# Altium PCB PCB1.PcbDoc
Units mm, origin at the board's own origin, x right, y up, seen from the top; angles counter-clockwise.
Board outline 35.5 x 30 mm, 2 copper layers (Top Layer, Bottom Layer); 43 components, 30 nets, 125 pads, 8 vias.
Unrouted connection lines stored in the file: 56.
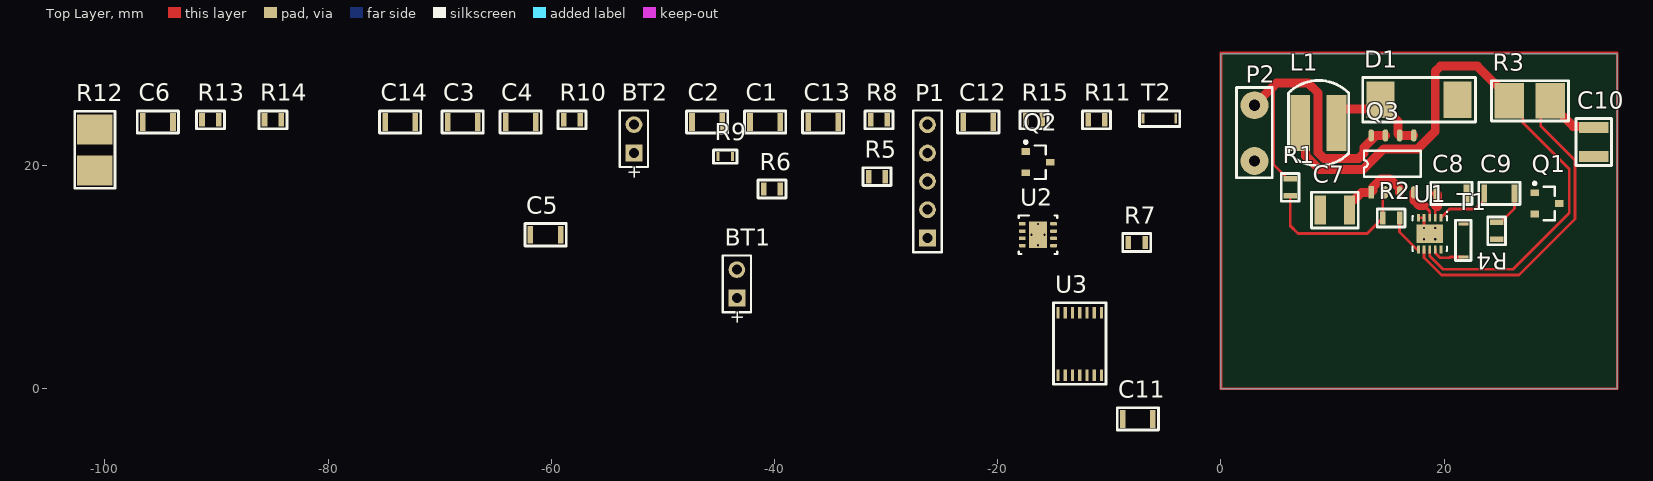
[diagram p0: Top Layer view]
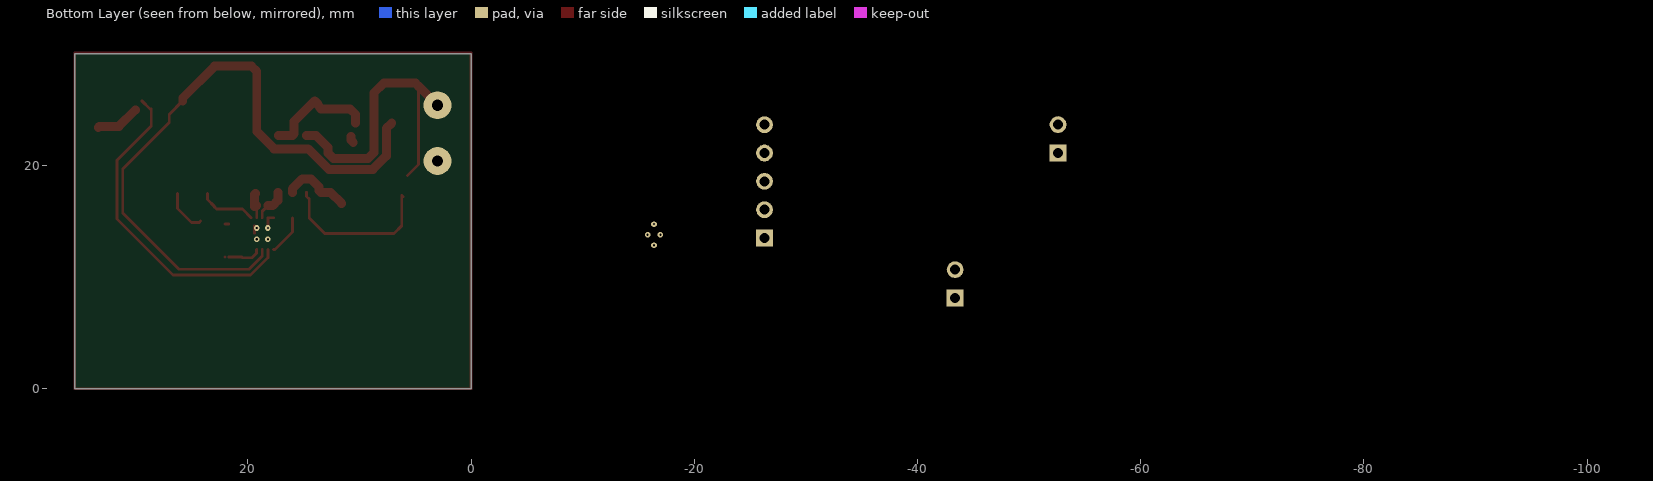
[diagram p1: Bottom Layer view, seen from below]

## Layer stack, top to bottom
Top Solder: solder mask 0.0102, Solder Resist, Dk 3.5
Top Layer: signal copper 0.0356
Dielectric 1: dielectric 0.32, FR-4, Dk 4.8
Bottom Layer: signal copper 0.0356
Bottom Solder: solder mask 0.0102, Solder Resist, Dk 3.5

## Board outline
0,0 35.5,0 35.5,30 0,30

## Design rules (kind name [scope] priority, off if disabled: settings)
Clearance [All] p1: gap=0.254 ignorepadtopadclearanceinfootprint=TRUE except(0: Arc-Hole Track-Hole SMDPad-Hole THPad-Hole Via-Hole Fill-Hole Poly-Hole Region-Hole Text-Hole; 0.2: Arc-Arc Arc-Track Track-Track)
PolygonConnect [All] p1: connectstyle=Relief reliefconductorwidth=0.254 reliefentries=4 polygonreliefangle="90 Angle" airgapwidth=0.254
RoutingVias [All] p1: holewidth=0.711 width=1.27 viastyle="Through Hole" minholewidth=0.711 minwidth=1.27 maxholewidth=0.711 maxwidth=1.27
SolderMaskExpansion [All] p1: expansion=0.102
Width [All] p1: maxlimit=0.8 minlimit=0.2 preferedwidth=0.254 minimp=50.000000 maximp=50.000000 favimp=50.000000
30 further rules are at their usual default settings.

## Components (designator, comment, footprint, x,y, rotation, side; value= is the part's Value field where it differs from the comment)
BT1 "Battery" BAT-2 -43.373,9.4 r90 top
BT2 "Battery" BAT-2 -52.6,22.4 r90 top
C1 "Cap1206" CAP1206 -42.2,23.9 r0 top
C2 "Cap1206" CAP1206 -47.4,23.9 r0 top
C3 "Cap1206" CAP1206 -69.3,23.9 r0 top
C4 "Cap1206" CAP1206 -64.1,23.9 r0 top
C5 "Cap1206" CAP1206 -61.873,13.8 r0 top
C6 "Cap1206" CAP1206 -96.6,23.9 r0 top
C7 "Cap1210" Ñap1210 10.2,16 r180 top
C8 "Cap1206" CAP1206 19.3,17.5 r0 top
C9 "Cap1206" CAP1206 23.6,17.5 r0 top
C10 "Cap1210" Ñap1210 33.4,22.1 r270 top
C11 "Cap1206" CAP1206 -6.1,-2.7 r180 top
C12 "Cap1206" CAP1206 -23.1,23.9 r0 top
C13 "Cap1206" CAP1206 -37,23.9 r0 top
C14 "Cap1206" CAP1206 -74.9,23.9 r0 top
D1 "B330-13-F" B330-13-F 21.2,25.9 r180 top
L1 "SDR0503-270ML" SDR0503 8.725,23.8 r180 top
P1 "Header 5" HDR1X5 -26.3,13.5 r90 top
P2 "THT Pad 5mm" "THT Pad 5mm" 3,20.4 r90 top
Q1 "BSS205N" INF-PG-SOT23_L 29.2,16.6 r0 top
Q2 "BSS205N" INF-PG-SOT23_L -16.4,20.3 r0 top
Q3 "SI9933BDY" "JEDEC MS-012.AA" 13.46,17.6 r90 top
R1 "Res0805" RES0805 6.2,18.8 r270 top
R2 "Res0805" RES0805 14.5,15.3 r0 top
R3 "Res2512" Res2512 27.665,25.8 r0 top
R4 "Res0805" RES0805 24.7,14.9 r270 top
R5 "Res0805" RES0805 -31.573,19 r0 top
R6 "Res0805" RES0805 -40.973,17.9 r0 top
R7 "Res0805" RES0805 -8.3,13.1 r0 top
R8 "Res0805" RES0805 -31.4,24.1 r0 top
R9 "Res0603" RES0603 -45.073,20.8 r0 top
R10 "Res0805" RES0805 -58.9,24.1 r0 top
R11 "Res0805" RES0805 -11.9,24.1 r0 top
R12 "Res2512" Res2512 -100.9,21.4 r90 top
R13 "Res0805" RES0805 -91.3,24.1 r0 top
R14 "Res0805" RES0805 -85.7,24.1 r0 top
R15 "Res0805" RES0805 -17.5,24.1 r0 top
T1 "B57621C5103J062" Therm1206 21.711,11.8 r90 top
T2 "B57621C5103J062" Therm1206 -7,24.2 r0 top
U1 "LTC4002EDD-8.4#TRPBF" LT-DD-10_V 18.7,13.9 r270 top
U2 "BQ29209DRBT" DRB0008B_V -16.4,13.8 r0 top
U3 "bq34z100-G1" bq34z100-G1 -14.6,1.2 r0 top

## Footprints (in the part's own frame and the unit in brackets; to place one, negate y for a bottom-side part, rotate by r counter-clockwise, add the part's x,y. Pads: shape width x height; smd on the part's side, far side on the other; paste and mask are expansions set on the pad)
B330-13-F [mm]
  rect 2.5x3.3 smd: 1(0,0) 2(6.9,0)
  silkscreen extent -1.6,-2 8.5,2
BAT-2 [mm] "Battery; 2 Leads"
  rect 1.5x1.5 hole 0.9: 1(-1.27,0)
  round 1.5 hole 0.9: 2(1.27,0)
  silkscreen extent -2.54,-1.27 2.54,1.27
bq34z100-G1 [mm]
  rect 0.3x1.05 smd: 1(0,0) 2(0.65,0) 3(1.3,0) 4(1.95,0) 5(2.6,0) 6(3.25,0) 7(3.9,0) 8(3.9,5.6) 9(3.25,5.6) 10(2.6,5.6) 11(1.95,5.6) 12(1.3,5.6) 13(0.65,5.6) 14(0,5.6)
  silkscreen extent -0.4,-0.8 4.3,6.5
CAP1206 [mm]
  rect 0.5x1.6 smd: 1(0,0) 2(2.7,0)
  silkscreen extent -0.5,-1 3.2,1
DRB0008B_V [mm] "SON, 8-Leads, Body 3x3mm, Pitch 0.65mm, Thermal Pad 2.4x1.65mm, TI Recommended"
  rrect33% 0.6x0.3 smd: 1(-1.4,0.975) 2(-1.4,0.325) 3(-1.4,-0.325) 4(-1.4,-0.975) 5(1.4,-0.975) 6(1.4,-0.325) 7(1.4,0.325) 8(1.4,0.975)
  rrect6% 1.65x2.4 smd paste-1.2: 9(0,0)
  silkscreen extent -1.73,-1.73 1.73,1.73, body extent -1.5,-1.5 1.5,1.5, height 0.96
HDR1X5 [mm] "Connector; Header; 5 Position"
  rect 1.5x1.5 hole 0.9: 1(0,0)
  round 1.5 hole 0.9: 2(2.54,0) 3(5.08,0) 4(7.62,0) 5(10.16,0)
  silkscreen extent -1.27,-1.27 11.43,1.27
INF-PG-SOT23_L [mm] "SOT23, 3-Leads, Body 2.9x1.3mm, Pitch 0.95mm, IPC High Density"
  rect 0.75x0.6 smd: 1(-1.1,0.95) 2(-1.1,-0.95) 3(1.1,0)
  silkscreen extent -1.22,-1.5 0.7,1.92, body extent -0.7,-1.5 0.7,1.5, height 1.1
"JEDEC MS-012.AA" [mm]
  rect 1.1x0.5 smd: 1(0,0)
  oval 1.1x0.5 smd: 2(0,-1.27) 3(0,-2.54) 4(0,-3.81) 5(5.1,-3.81) 6(5.1,-2.54) 7(5.1,-1.27) 8(5.1,0)
  silkscreen extent 1.38,-4.44 3.72,0.64
LT-DD-10_V [mm] "SON, 10-Leads, Body 3x3mm, Pitch 0.5mm, Thermal Pad 2.38x1.65mm"
  rect 0.7x0.25 smd mask+0.102: 1(-1.425,1) 2(-1.425,0.5) 3(-1.425,0) 4(-1.425,-0.5) 5(-1.425,-1) 6(1.425,-1) 7(1.425,-0.5) 8(1.425,0) 9(1.425,0.5) 10(1.425,1)
  rect 1.65x2.38 smd mask+0.102: 11(0,0)
  silkscreen extent -2,-1.55 1.55,1.6, body extent -1.5,-1.5 1.5,1.5, height 0.8
RES0603 [mm]
  rect 0.3x0.8 smd: 1(0,0) 2(1.3,0)
  silkscreen extent -0.4,-0.6 1.7,0.6
RES0805 [mm]
  rect 0.5x1.2 smd: 1(0,0) 2(1.5,0)
  silkscreen extent -0.5,-0.8 2,0.8
Res2512 [mm]
  rect 2.68x3.18 smd: 1(-1.835,0) 2(1.835,0)
  silkscreen extent -3.43,-1.8 3.46,1.8
SDR0503 [mm]
  rect 1.75x5 smd: 1(-1.625,0) 2(1.625,0)
  silkscreen extent -2.73,-3.82 2.67,3.82
Therm1206 [mm]
  rect 0.25x0.9 smd: 1(0,0) 2(2.95,0)
  silkscreen extent -0.3,-0.7 3.3,0.7
"THT Pad 5mm" [mm]
  round 2.5 hole 1: 1(0,0) 2(5,0)
  silkscreen extent -1.5,-1.6 6.6,1.6
Ñap1210 [mm]
  rect 1x2.6 smd: 1(-1.3,0) 2(1.3,0)
  silkscreen extent -2.1,-1.6 2.1,1.6

## Part data
BT1 BT2: "Multicell Battery", LatestRevisionDate=17-Jul-2002, LatestRevisionNote="Re-released for DXP Platform.", PackageDescription="Battery; 2 Leads", PackageReference=BAT-2, Published=24-Mar-1999, Publisher="Altium Limited"
P1: "Header, 5-Pin", LatestRevisionDate=17-Jul-2002, LatestRevisionNote="Re-released for DXP Platform.", Publisher="Altium Limited"
Q1 Q2: library part CMP-1149-00030-1, "N-Channel OptiMOS 2 Small-Signal-Transistor, 20 V VDS, 2.5 A ID, -55 to 150 degC, PG-SOT23, Reel, Green", Manufacturer=Infineon, ComponentLink1Description="Manufacturer URL", ComponentLink1URL=http://www.infineon.com/, ComponentLink2Description=Datasheet, ComponentLink2URL=http://www.infineon.com/dgdl/BSS205N_Rev2.4.pdf?folderId=db3a3043156fd573011622e10b5c1f67&fileId=db3a304330f686060131091244950062, ComponentLink3Description="Package Specification", ComponentLink3URL=http://www.infineon.com/dgdl/SOT23-Package_Overview.pdf?folderId=db3a30431936bc4b0119532290053c66&fileId=db3a30431936bc4b0119533468123c85, DatasheetVersion="Rev. 2.4", Green=TRUE, Halogen-free=TRUE, ID (max)="2.5A A", IDpuls (max)="10 A", Mounting Technology="Surface Mount", PackageDescription="3-Pin Small Outline Transistor Package, 2.9 x 1.3 mm Body, 0.95 mm Pitch", PackageReference=PG-SOT23, PackageVersion=Apr-08, Packing=Reel, PartNumber=BSS205N, Ptot (max)="0.5A W", QG="2.1A nC", RDS (on) (max)="85 mOhm", RDS (on) (max) (@2.5V)="85 mOhm", RDS (on) (max) (@4.5V)="50 mOhm", RthJA (max)="250 K/W", VDS (max)="20 V", VGS(th) (max)="1.2A V", VGS(th) (min)="0.7A V"
U1: library part CMP-0471-00077-1, "Standalone Li-Ion Switch Mode Battery Charger, 8.9 to 22 V Vin, 10-pin SON (DD-10), -40 to 85 degC, Pb-Free, Tape and Reel", Float Voltage="8.4 V", Manufacturer="Linear Technology", Battery Chemistry="Li-Ion, Li-Polymer", Charge Termination="On-board timer", Code_JEDEC=MO-229, ComponentLink1Description="Manufacturer URL", ComponentLink1URL=http://www.linear.com/, ComponentLink2Description=Datasheet, ComponentLink2URL=http://cds.linear.com/docs/en/datasheet/4002f.pdf, ComponentLink3Description="Package Specification", ComponentLink3URL=http://cds.linear.com/docs/en/packaging/DFN_10_05-08-1699.pdf, Mounting Technology="Surface Mount", Number of Cells=2, PackageDescription="10-Pin Plastic DFN, Body 3 x 3 mm, Pitch 0.5 mm", PackageReference=DD-10, PackageVersion="Rev. C, 06/2010", Packing="Tape and Reel", PartNumber=LTC4002EDD-8.4#TRPBF, RoHS=TRUE, Type of Charger=Switching, Vin Max(V)=22, Vin Min(V)=8.9
U2: library part CMP-0321-00625-2, "Voltage Protection with Automatic Cell Balance for 2-Cell Li-Ion Batteries, OVP=4.3 V, -40 to 85 degC, 8-pin SON (DRB), Green (RoHS & no Sb/Br)", Manufacturer="Texas Instruments", Over Voltage Protection=N, ComponentLink1Description=Datasheet, ComponentLink1URL=http://www.ti.com/general/docs/lit/getliterature.tsp?genericPartNumber=BQ29209&fileType=pdf, DatasheetVersion=SLUSA52A, Eco-Plan="Green (RoHS & no Sb/Br)", Lead Acid=N, Li-Ion=N, Li-Polymer=N, Mounting Technology="Surface Mount", NiCd=N, NiMH=N, PackageDescription="8-Pin Plastic Small Outline No-Lead, 3 x 3 x 1 mm Body, 0.65 mm Pitch, Exposed Pad", PackageReference=DRB0008B, PackageVersion="revK, Jun-2012", PartNumber=BQ29209DRBT, SubFamily="Lithium Ion Protection"

## Via types
v1: diameter 0.5, hole 0.2, Top Layer to Bottom Layer, 8 vias

## Nets (pads, with @x,y where several pads share a name; then routed paths per layer and width w, separated by ;. In a path a pad name is that pad's centre, name@x,y a point inside that pad or via, vN(x,y) a via of type N, cw(c..) or ccw(c..) an arc to the next point about the centre after c; other vN are vias at no path point)
GND: C7.2 C8.2 C10.2 D1.1 P1.5 P2.1 Q1.2 R4.2 R12.2 R13.2 T1.2 U1.4 U1.5 U1.11 | length 2.5
  Top Layer w0.254: U1.5 U1.4 U1.11@18.2,14.594 ; v1(19.2,14.4) 19.4,14.6 U1.11@19.4,13.925 ; T1.2 T1.2@22.032,14.75
  other v1: 18.2,13.4 19.2,13.4 18.2,14.4
NetBT1_1: BT1.1 C10.1 P1.1 Q2.3 R3.2 R5.2 R6.1 R8.2 R9.1 U1.7 | length 33.2
  Top Layer w0.254: U1.7 18.2,11.744 19.744,10.2 26.7,10.2 31.719,15.219 31.719,20.471 28.654,23.536 28.654,25.051 28.751,25.051 R3.2
  Top Layer w0.8: R3.2@30.075,24.975 31.55,23.5 33.3,23.5 C10.1
NetBT1_2: BT1.2 BT2.1 R7.2 R10.2
NetBT2_2: BT2.2 C1.2 C2.2 C4.1 C5.2 C6.2 C11.2 C12.2 C14.2 R11.1 R12.1 R14.2 R15.2 U2.5 U2.6 U2.9 U3.3 U3.8
  other v1: -16.4,12.85 -16.975,13.8 -15.825,13.8 -16.4,14.75
NetC1_1: C1.1 Q2.2 U3.5 U3.6
NetC2_1: C2.1 R9.2 R11.2 U3.4
NetC3_1: C3.1 C4.2 R14.1 U3.9
NetC3_2: C3.2 C6.1 R13.1 U3.10
NetC5_1: C5.1 T2.2 U3.7
NetC7_1: C7.1 C8.1 Q3.1 Q3.3 U1.2 | length 8.6
  Top Layer w0.254: U1.2 19.2,16 19.4,16.2
  Top Layer w0.8: C7.1@11.6,16.6 12.6,17.6 Q3.1 13.61,17.75 13.61,18.058 14.356,18.804 15.104,18.804 16,17.908 Q3.3 ; 19.214,16.414 19.299,16.329 19.4,16.329 19.4,17.4 C8.1
NetC9_1: C9.1 Q1.3 U1.1 | length 5.2
  Top Layer w0.254: U1.1 19.706,15.325 20.481,16.1 22.8,16.1 23,16.3 23,16.35 23.6,16.95 C9.1
NetC9_2: C9.2 R4.1 | length 4
  Top Layer w0.254: R4.1@24.227,15.023 24.35,14.9 R4.1 25.05,14.9 26.3,16.15 C9.2
NetC11_1: C11.1 R5.1 U2.7
NetC12_1: C12.1 U2.4
NetC13_1: C13.1 R8.1 U2.1
NetC13_2: C13.2 C14.1 R10.1 U2.2
NetD1_2: D1.2 L1.1 Q3.5 Q3.6 | length 10.8
  Top Layer w0.8: L1.1 10.35,24.575 10.825,25.05 13.45,25.05 13.8,25.6 14,25.8 14.3,25.5 15.85,23.95 15.85,22.85 Q3.6 Q3.5 ; L1.1@10.55,22.075 10.75,22.275 L1.1@10.75,22.6
NetL1_2: L1.2 R3.1 U1.8 | length 58.3
  Top Layer w0.254: U1.8 18.7,11.886 19.886,10.7 26.151,10.7 31.2,15.749 31.2,19.7 27.043,23.857 27.043,24.587 R3.1
  Top Layer w0.8: L1.2 7.575,23.325 7.575,20.861 8.79,19.646 12.746,19.646 14.596,21.496 17.644,21.496 19.2,23.052 19.2,28.431 19.669,28.9 22.98,28.9 25.83,26.05 R3.1
NetP1_2: P1.2 U3.14
NetP1_3: P1.3 U3.13
NetP1_4: P1.4 U3.1
NetP2_2: P2.2 Q3.7 Q3.8 R1.1 | length 28
  Top Layer w0.254: 4.7,27.1 4.7,20.1 5.7,19.1
  Top Layer w0.8: P2.2 4.7,27.1 4.983,27.383 7.817,27.383 8.7,26.5 8.7,21.15 9.204,20.646 12.331,20.646 12.8,21.115 12.8,21.6 13.9,22.7 Q3.7
NetQ1_1: Q1.1 U2.8
NetQ2_1: Q2.1 R6.2 R15.1
NetQ3_2: Q3.2 R1.2 R2.1 | length 14.4
  Top Layer w0.254: R1.2@6.1,17.2 R1.2 6.2,14.6 6.9,13.9 13.1,13.9 R2.1 14.5,17.003 14.73,17.233 Q3.2
NetQ3_4: Q3.4 U1.3 | length 3.5
  Top Layer w0.254: Q3.4@17.27,17.269 Q3.4 ; 18.2,16.4 18.7,15.9 U1.3
  Top Layer w0.8: Q3.4 17.3,17.57 17.3,16.869 17.769,16.4 18.2,16.4
NetR2_2: R2.2 U1.6 | length 3.6
  Top Layer w0.254: R2.2 16,14.046 17.571,12.475 U1.6@17.694,12.475
NetR7_1: R7.1 U2.3
NetT1_1: T1.1 U1.9 | length 3
  Top Layer w0.254: U1.9 19.206,12.469 19.206,12.138 19.6,11.744 20.467,11.744 20.523,11.8 T1.1 ; T1.1@22.032,11.8 T1.1@22.034,11.798
NetT2_1: T2.1 U3.11
pads on no net: U1.10 U3.2 U3.12
copper on no net: | length 131
  Top Layer w0.254: 0,30 0,0 35.5,0 35.5,30 ; 0,30.1 35.5,30.1

## Polygon pours and split planes (outlines as drawn)
GND on Top Layer (solid, pour order 10): 7.9,0.1
no net on Top Layer (solid, pour order 6): 16.1,28.2

## Text inside footprints (layer, text, board x,y; h text height)
BT1: Top Overlay "+" at -42.796,5.73 h1.15 r90
BT2: Top Overlay "+" at -52.023,18.73 h1.15 r90